# Altium PCB board.PcbDoc (part 3 of 3)
Units mm, origin at the board's own origin, x right, y up, seen from the top; angles counter-clockwise.
Board outline 86 x 120 mm, 4 copper layers (Top Layer, Signal Layer 1, Signal Layer 2, Bottom Layer), stack 1.571 mm thick; 144 components, 93 nets, 930 pads, 372 vias.
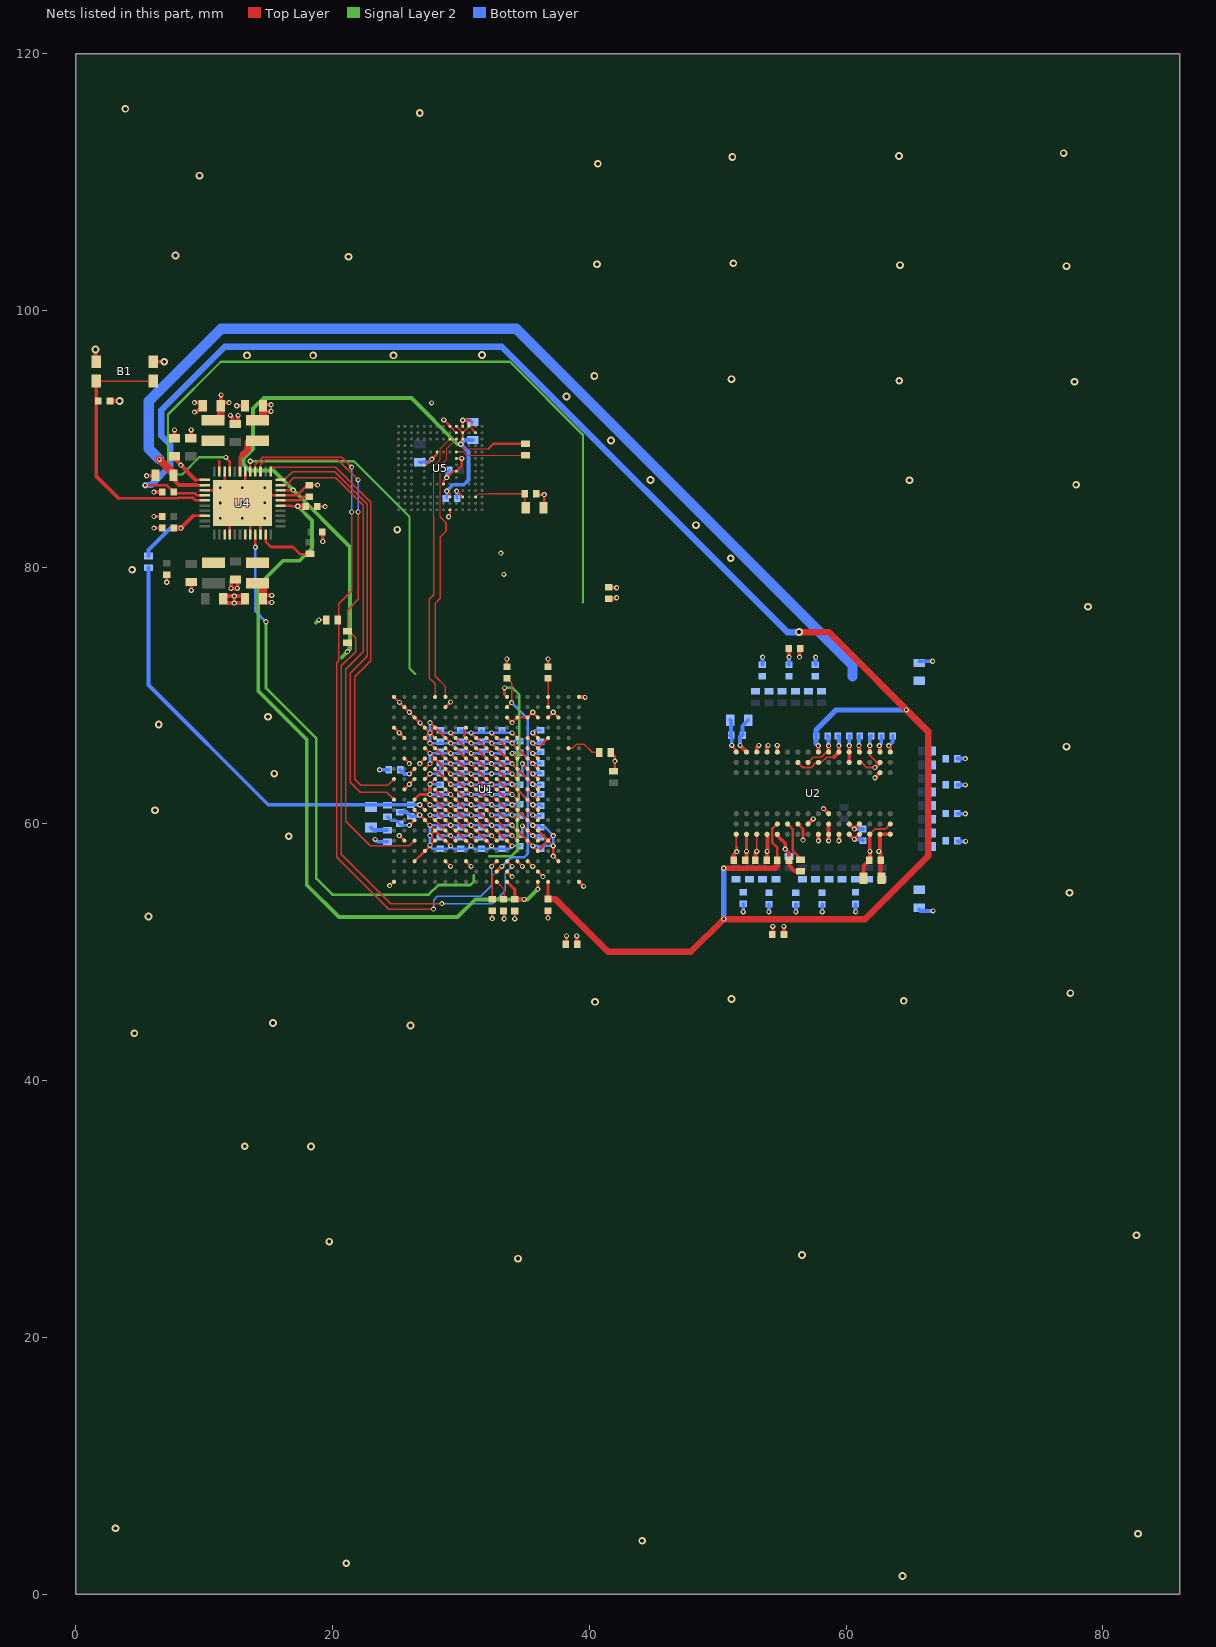
[diagram p5: the nets of this part, all layers, seen from the top]

## Via types
v1: diameter 0.4, hole 0.2, Top Layer to Bottom Layer, tented both sides, 309 vias
v2: diameter 0.6, hole 0.3, Top Layer to Bottom Layer, tented both sides, 61 vias
v3: diameter 0.4, hole 0.2, Top Layer to Signal Layer 1, tented top, 2 vias

## Nets (pads, with @x,y where several pads share a name; then routed paths per layer and width w, separated by ;. In a path a pad name is that pad's centre, name@x,y a point inside that pad or via, vN(x,y) a via of type N, cw(c..) or ccw(c..) an arc to the next point about the centre after c; other vN are vias at no path point) (continued)
GND: B1.1 B1.2 C1.1 C2.1 C3.1 C4.1 C5.1 C6.1 C7.1 C8.1 C9.1 C10.1 C11.1 C12.1 C13.1 C14.1 C15.1 C16.1 C17.1 C18.1 C19.1 C20.1 C21.1 C22.2 C23.1 C24.1 C25.1 C26.1 C27.1 C28.1 C29.1 C30.1 C31.1 C32.1 C33.1 C34.1 C35.1 C36.1 C37.1 C38.1 C39.1 C40.1 C41.1 C42.1 C43.1 C44.1 C45.1 C46.1 C47.1 C48.1 C49.1 C50.1 C51.2 C52.1 C53.1 C54.1 C55.1 C56.1 C57.1 C58.1 C59.1 C60.1 C61.1 C62.1 C63.1 C64.1 C65.1 C66.1 C67.1 C68.1 C69.1 C70.1 C71.1 C72.1 C73.1 C74.1 C75.1 C76.1 C77.1 C78.1 C79.1 C80.1 C81.1 C82.1 C83.1 C84.1 C85.1 C86.1 C87.1 C88.1 C89.1 C90.1 C91.1 C92.1 C93.1 C94.1 C95.1 C96.1 C97.1 R26.1 R27.2 R29.1 R30.1 U1.A1 U1.A19 U1.B2 U1.B6 U1.C3 U1.C12 U1.C13 U1.C14 U1.C15 U1.C16 U1.C17 U1.D1 U1.D4 U1.D5 U1.D8 U1.E2 U1.E4 U1.E5 U1.E6 U1.E8 U1.E10 U1.E12 U1.E14 U1.E16 U1.F5 U1.F7 U1.F9 U1.F11 U1.F13 U1.F15 U1.G2 U1.G4 U1.G6 U1.G8 U1.G10 U1.G12 U1.G14 U1.H5 U1.H7 U1.H9 U1.H11 U1.H13 U1.H15 U1.J3 U1.J4 U1.J6 U1.J8 U1.J10 U1.J12 U1.J14 U1.K2 U1.K5 U1.K7 U1.K9 U1.K11 U1.K13 U1.K15 U1.L4 U1.L6 U1.L8 U1.L10 U1.L12 U1.L14 U1.M3 U1.M5 U1.M7 U1.M9 U1.M11 U1.M13 U1.M15 U1.N4 U1.N6 U1.N8 U1.N10 U1.N12 U1.N14 U1.P5 U1.P7 U1.P9 U1.P11 U1.P13 U1.P15 U1.R2 U1.R5 U1.R6 U1.R8 U1.R10 U1.R12 U1.R14 U1.R16 U1.T4 U1.T15 U1.U3 U1.U6 U1.U8 U1.U13 U1.U14 U1.U17 U1.V12 U1.V15 U1.W1 U1.W19 U2.A9 U2.B1 U2.B3 U2.B9 U2.D1 U2.D8 U2.E1 U2.E2 U2.E8 U2.F9 U2.G1 U2.G8 U2.G9 U2.J2 U2.J8 U2.M1 U2.M9 U2.P1 U2.P9 U2.T1 U2.T9 U4.6 U4.10 U4.15 U4.26 U4.30 U4.32 U4.41 U4.ep U5.A6 U5.C4 U5.E7 U5.G5 U5.H10 U5.J5 U5.K8 U5.N2 U5.N5 U5.P4 U5.P6 | length 253.9
  Top Layer w0.09: 30.675,91.45 30.9,91.225 30.9,90.725
  Top Layer w0.12: U1.U17@37.55,57.1 U1.U17@37.6,57.1 ; U2.M1@54.65,65.6 U2.M1@54.65,65.7 ; C25.1@55.54,57.19 C25.1@55.56,57.17 ; v1@58.65,58.61 v1(58.65,58.7) ; U2.E8@60.25,60 U2.E8@60.27,60
  Top Layer w0.15: 51.45,58.25 U2.T9@51.45,59.2 ; v1(53.05,57.87) U2.P9@53.05,59.2 ; U2.J2@57.05,64.8 57.45,65.2 58.07,65.2 58.47,65.6 U2.G1@58.65,65.6
  Top Layer w0.175: B1.1@1.55,96.05 B1.1@1.6,96 B1.1@1.6,96.25 ; C46.1@6.2,87.125 C46.1@6.225,87.15 ; C18.1@8.975,90.05 C18.1@9,90.075 ; C29.1@9.65,92.825 C29.1@9.9,92.575 ; C40.1@11.7,77.75 C40.1@11.5,77.55 11.85,77.2 ; C33.1@12.425,91.15 C33.1@12.65,91.375 ; 12.85,77.2 C38.1@13.2,77.55 C38.1@13,77.75 ; U4.ep@13,85 13.2,85.2 13.6,85.6 U4.41@15.95,85.6 ; C52.1@18.85,84.725 v1(19.425,84.725) ; C51.2@19.2,82.75 C51.2@19.25,82.7 ; U5.H10@27.15,87.975 27.3,87.975 v1(27.75,88.425) 28.15,88.825 U5.K8@28.15,88.975 ; U5.E7@28.65,86.475 28.65,86.725 v1(28.9,86.975) 29.4,87.475 U5.G5@29.65,87.475 30.075,87.9 v1(30.075,88.475) U5.J5@29.65,88.475 ; v1(28.675,91.475) 29.15,91 U5.P6@29.15,90.975 U5.N5@29.65,90.475 ; v1(29.05,83.925) 29.15,84.025 U5.A6@29.15,84.475 ; v1(29.675,85.925) 29.7,85.925 U5.C4@30.15,85.475 ; U5.P4@30.15,90.948 U5.P4@30.15,90.975 v1(30.15,91.45) 30.675,91.45 ; 30.9,90.725 U5.N2@31.15,90.475 ; v1@33.125,81 v1(33.125,81.1) ; C82.1@35.875,85.725 35.95,85.65 v1(36.5,85.65) 36.5,84.675 C83.1@36.45,84.625
  Top Layer w0.2: U4.15@10.05,86 U4.ep@12,86 ; U4.10@11.6,87.45 11.6,86.4 U4.ep@12,86 ; U4.26@12,82.55 12,84 U4.ep@13,85 ; U4.ep@13.2,85.2 U4.6@13.2,87.45 ; U4.30@13.6,82.55 U4.ep@13.6,84.4 ; U4.32@14.4,82.55 14.4,83.6 U4.ep@13.6,84.4 ; U4.41@15.95,85.6 17.25,85.6 18.05,86.4 C43.1@18.2,86.4 ; v1(24.45,55.2) 24.75,55.5 U1.W1@24.8,55.5 ; U1.D1@24.8,67.5 U1.E2@25.6,66.7 ; U1.A1@24.8,69.9 v1(25.225,69.475) v1(26,68.7) v1(27.6,67.1) ; v1(25.2,59.1) U1.R2@25.6,58.7 ; U1.K2@25.6,62.7 v1(26,63.1) U1.J3@26.4,63.5 ; U1.G2@25.6,65.1 v1(26,64.7) ; U1.U3@26.4,57.1 U1.T4@27.2,57.9 U1.R5@28,58.7 v1(27.6,59.1) U1.P5@27.995,59.495 ; U1.M3@26.4,61.1 v1(26.8,60.7) U1.N4@27.2,60.3 27.2,60.29 v1(27.6,59.89) U1.P5@27.995,59.495 ; v1(26.8,64.7) U1.G4@27.2,65.1 ; U1.L4@27.2,61.9 v1(27.6,61.5) v1(29.2,59.9) U1.R8@30.4,58.7 v1(30.8,58.3) ; U1.J4@27.2,63.5 27.2,63.51 v1(27.6,63.91) ; v1(27.6,67.9) U1.D5@28,67.5 ; U1.P5@28,59.5 U1.P5@27.995,59.495 ; U1.K5@28,62.7 v1(29.2,61.5) U1.M7@29.6,61.1 U1.P9@31.2,59.5 U1.R10@32,58.7 v1(32.4,58.3) ; U1.H5@28,64.3 U1.J6@28.8,63.5 v1(29.2,63.1) v1(30.8,61.5) U1.M9@31.2,61.1 U1.N10@32,60.3 v1(32.4,59.9) v1(34,58.3) ; U1.E5@28,66.7 v1(27.6,67.1) ; U1.U6@28.8,57.1 v1(29.2,56.7) ; U1.B6@28.8,69.1 v1(29.2,69.5) ; v1(29.2,58.3) U1.R6@28.8,58.7 28.79,58.7 U1.P5@27.995,59.495 ; U1.U8@30.4,57.1 v1(30.8,56.7) ; U1.D8@30.4,67.5 30.27,67.37 30.27,66.83 U1.E8@30.4,66.7 v1(30.8,66.3) U1.G10@32,65.1 v1(32.4,64.7) v1(34,63.1) v1(35.6,61.5) U1.M15@36,61.1 ; U1.E10@32,66.7 v1(32.4,66.3) v1(34,64.7) U1.H13@34.4,64.3 v1(35.6,63.1) U1.K15@36,62.7 ; v1(32.45,52.63) C67.1@32.45,53.24 ; v1(33.37,52.62) C69.1@33.37,53.24 ; C66.1@33.59,72.37 v1@33.59,72.84 ; U1.V12@33.6,56.3 v1(34,55.9) ; U1.E12@33.6,66.7 v1(34,66.3) U1.G14@35.2,65.1 v1(35.6,64.7) U1.H15@36,64.3 ; U1.C12@33.6,68.3 v1(34,67.9) U1.C13@34.4,68.3 U1.C14@35.2,68.3 v1(35.6,68.7) U1.C15@36,68.3 ; v1(34.2,52.605) C71.1@34.2,53.225 ; U1.U13@34.4,57.1 v1(34.8,56.7) ; U1.U14@35.2,57.1 v1(35.6,56.7) ; U1.E14@35.2,66.7 v1(35.6,66.3) U1.F15@36,65.9 U1.E16@36.8,66.7 ; U1.V15@36,56.3 v1(36.4,55.9) ; v1(36.79,52.68) C72.1@36.79,53.26 ; U1.C16@36.8,68.3 v1(37.2,68.7) U1.C17@37.6,68.3 ; C68.1@36.8,72.25 v1(36.8,72.85) ; v1(37.2,59.1) U1.R16@36.8,58.7 ; U1.U17@37.6,57.1 v1(37.2,57.5) v1(37.2,58.3) U1.R16@36.8,58.7 ; C28.1@38.18,50.63 38.23,50.68 v1(38.23,51.28) ; R27.2@41.73,65.64 R27.2@41.67,65.58 42,65.25 v1(42,64.9) 42,64.225 R29.1@41.875,64.1 ; v1(51.1,66.12) 51.45,65.77 U2.T1@51.45,65.6 ; 51.45,58.25 51.49,58.21 v1(51.49,57.85) ; U4.ep@12,86 U4.ep@13,85 ; U4.ep@13,85 U4.ep@13.6,84.4 ; v1(27.6,67.1) U1.E4@27.2,66.7 v1(27.6,66.3) U1.F5@28,65.9 v1(29.2,64.7) U1.H7@29.6,64.3 U1.J8@30.4,63.5 v1(30.8,63.1) U1.L10@32,61.9 v1(32.4,61.5) U1.M11@32.8,61.1 v1(34,59.9) U1.R14@35.2,58.7 v1(35.6,58.3) U1.T15@36,57.9 U1.R16@36.8,58.7 ; v1(27.6,67.1) U1.D5@28,67.5 ; U1.D5@28,67.5 U1.E6@28.8,66.7 v1(29.2,66.3) U1.G8@30.4,65.1 v1(30.8,64.7) v1(32.4,63.1) U1.K11@32.8,62.7 v1(34,61.5) U1.N14@35.2,60.3 U1.P15@36,59.5 U1.R16@36.8,58.7
  Top Layer w0.25: v3(6.1,83.05) C49.1@6.75,83.05 ; v3(6.1,83.95) C41.1@6.75,83.95 ; v1(7.1,78.825) C32.1@7.1,79.4 ; v1(9,78.2) C39.1@9,78.85 ; C43.1@18.2,86.4 v1(18.85,86.4)
  Top Layer w0.3: B1.1@1.55,96.05 v2(1.55,96.95) ; C44.1@2.675,92.95 v2(3.425,92.95) ; v1(5.525,87.125) C46.1@6.2,87.125 ; B1.2@6.05,96 v2(6.9,96) ; v1(6.1,85.85) C45.1@6.75,85.85 ; C42.1@7.7,90.05 v1(7.7,90.7) ; C18.1@9,90.075 v1(9,90.7) ; v1(9.25,92.075) 9.4,92.075 C29.1@9.9,92.575 ; v1(9.25,92.825) C29.1@9.65,92.825 ; C40.1@11.7,77.75 v1(12.35,77.75) ; 11.85,77.2 v1(12.35,77.2) ; v1(12.05,91.825) 12.225,91.65 C33.1@12.225,91.375 ; C31.1@12.1,79 v1(12.1,78.35) v1(12.6,78.35) 12.6,78.9 C31.1@12.45,79.05 ; v1(12.55,92.575) C34.1@13.2,92.575 ; C33.1@12.65,91.375 v1(12.65,91.825) ; 12.85,77.2 v1(12.35,77.2) ; C38.1@13,77.75 v1(12.35,77.75) ; v1(19.25,82) C51.2@19.25,82.7 ; U1.W19@39.2,55.5 v1(39.56,55.14) ; U1.A19@39.2,69.9 39.64,69.9 v1(39.68,69.86) ; C26.1@41.52,78.45 41.57,78.4 v1(42.13,78.4) ; C73.1@51.25,57.17 51.25,57.61 v1(51.49,57.85) ; C19.1@52.94,57.17 52.94,57.76 v1(53.05,57.87) ; U2.P1@53.05,65.6 53.05,65.96 v1(53.21,66.12) ; U2.M9@54.65,59.2 54.65,59.1 55.27,58.48 v1(55.27,58.05) 55.27,58 55.54,57.73 C25.1@55.54,57.19 ; U2.M1@54.65,65.6 v1(54.65,66.12) ; v1(55.16,52.02) 55.16,51.41 C74.1@55.17,51.4 ; C27.1@55.53,73.68 55.57,73.64 v1(55.57,73) ; C25.1@55.56,57.17 55.59,57.14 55.59,56.72 55.98,56.33 R26.1@56.46,56.33 ; U2.J8@57.05,60 v1(57.45,60.4) ; v1(58.65,58.7) U2.G8@58.65,60 ; U2.G1@58.65,65.6 v1(58.65,66.1) ; v1(59.45,58.7) U2.F9@59.45,59.2 ; U2.E8@60.25,60 v1(60.65,59.6) U2.D8@61.05,60 ; U2.E2@60.25,64.8 v1(60.25,66.1) ; v1(61.01,66.1) 61.01,65.64 U2.D1@61.05,65.6 ; v1(62.25,63.6) U2.B3@62.65,64 ; v1(62.59,66.1) 62.65,66.04 U2.B1@62.65,65.6 ; C15.1@62.7,55.89 C17.1@62.7,57.17 62.7,57.72 v1(62.55,57.87) 62.65,57.97 U2.B9@62.65,59.2 U2.A9@63.45,59.2 ; v1(12.35,77.2) v1(12.35,77.75)
  Bottom Layer w0.12: v1@58.62,66.13 v1(58.65,66.1)
  Bottom Layer w0.175: v1(29.675,85.925) 29.675,85.4 C80.1@29.725,85.35 ; C81.1@30.775,91.45 C81.1@30.925,91.3
  Bottom Layer w0.2: v1(27.6,61.5) 27.68,61.42 C65.1@28.4,61.42 28.48,61.5 v1(29.2,61.5) 29.28,61.42 C88.1@30,61.42 30.08,61.5 v1(30.8,61.5) 30.88,61.42 C89.1@31.6,61.42 31.68,61.5 v1(32.4,61.5) 32.48,61.42 C90.1@33.2,61.42 33.28,61.5 v1(34,61.5) 34.06,61.56 C91.1@34.6,61.56 ; v1(27.6,63.91) 28.34,63.91 C48.1@28.4,63.97 C84.1@28.4,64.72 28.42,64.7 v1(29.2,64.7) 29.22,64.72 C35.1@30,64.72 30.02,64.7 v1(30.8,64.7) 30.82,64.72 C36.1@31.6,64.72 31.62,64.7 v1(32.4,64.7) 32.42,64.72 C37.1@33.2,64.72 33.22,64.7 v1(34,64.7) ; v1(27.6,67.9) v1(27.6,67.1) v1(27.6,66.3) 28.31,66.3 C30.1@28.4,66.39 28.49,66.3 v1(29.2,66.3) 29.91,66.3 C75.1@30,66.39 30.71,66.39 v1(30.8,66.3) 31.51,66.3 C76.1@31.6,66.39 32.31,66.39 v1(32.4,66.3) 33.11,66.3 C77.1@33.2,66.39 33.91,66.39 v1(34,66.3) 34.2,66.5 C47.1@34.8,66.5 ; v1(29.2,63.1) 29.23,63.07 C85.1@30,63.07 30.03,63.1 v1(30.8,63.1) 30.83,63.07 C86.1@31.6,63.07 31.63,63.1 v1(32.4,63.1) 32.43,63.07 C87.1@33.2,63.07 33.23,63.1 v1(34,63.1) ; v1(34,59.9) 33.34,59.9 C13.1@33.2,59.76 33.06,59.9 v1(32.4,59.9) 31.74,59.9 C94.1@31.6,59.76 31.46,59.9 v1(30.8,59.9) 30.14,59.9 C93.1@30,59.76 29.86,59.9 v1(29.2,59.9) 28.54,59.9 C92.1@28.4,59.76 28.27,59.89 v1(27.6,59.89) v1(27.6,59.1) v1(27.6,58.33) 27.6,58.25 27.78,58.07 C95.1@28.4,58.07 28.97,58.07 v1(29.2,58.3) 29.43,58.07 C96.1@30,58.07 30.57,58.07 v1(30.8,58.3) 31.03,58.07 C97.1@31.6,58.07 32.17,58.07 v1(32.4,58.3) 32.63,58.07 C14.1@33.2,58.07 33.77,58.07 v1(34,58.3) C59.1@34.6,58.3 ; v1@34.03,63.07 v1(34,63.1) ; C55.1@34.6,63.1 v1(34,63.1) ; v1(35.6,58.3) 35.99,58.3 C60.1@36.22,58.07 36.245,58.045 36.5,58.3 v1(37.2,58.3) v1(37.2,59.1) 36.54,59.76 36.27,59.76 36.13,59.9 v1(35.6,59.9) ; v1(35.6,61.5) 36.2,61.5 C57.1@36.3,61.4 ; v1(35.6,63.1) 35.63,63.07 C56.1@36.22,63.07 ; v1(35.6,64.7) 35.62,64.72 C54.1@36.22,64.72 ; v1(35.6,66.3) 36.13,66.3 C53.1@36.22,66.39 ; C12.1@51.99,53.8 C12.1@52,53.79 ; C11.1@54,53.75 C11.1@54.01,53.76 ; v1(55.27,58.05) 55.57,57.75 R30.1@55.57,57.47 ; C10.1@56.09,53.76 C10.1@56.1,53.75 ; C9.1@58.14,53.76 C9.1@58.15,53.75 ; C8.1@60.73,53.77 C8.1@60.75,53.75 ; C7.1@68.66,58.69 C7.1@68.7,58.65 ; C6.1@68.66,60.81 C6.1@68.67,60.8 ; C5.1@68.66,63.06 C5.1@68.67,63.05 ; C4.1@68.66,65.08 C4.1@68.67,65.09
  Bottom Layer w0.3: v1(23.675,64.225) C61.1@24.375,64.225 ; C50.1@25.25,60.925 25.775,60.925 C70.1@26.1,60.6 26.7,60.6 v1(26.8,60.7) ; C79.1@26.8,88.175 27.5,88.175 v1(27.75,88.425) ; v1(28.9,86.975) 28.9,87.35 C78.1@29.1,87.55 ; v1(30.15,91.45) C81.1@30.775,91.45 ; C64.1@50.95,66.91 51.1,66.76 v1(51.1,66.12) ; C16.1@50.99,68.09 51.05,68.03 C64.1@51.05,66.91 ; v1(52,53.15) C12.1@52,53.79 ; C1.1@53.48,72.4 53.5,72.42 v1(53.5,73) ; v1(54,53.15) C11.1@54,53.75 ; C2.1@55.55,72.4 55.57,72.42 v1(55.57,73) ; v1(56.1,53.15) C10.1@56.1,53.75 ; C3.1@57.61,72.4 57.63,72.42 v1(57.63,73) ; v1(58.15,53.15) C9.1@58.15,53.75 ; C24.1@58.57,66.86 58.65,66.78 v1(58.65,66.1) ; v1(60.25,66.1) 60.25,66.84 C23.1@60.27,66.86 ; v1(60.65,59.6) 60.66,59.61 C22.2@61.33,59.61 ; v1(60.75,53.15) C8.1@60.75,53.75 ; v1(61.01,66.1) 61.01,66.81 C21.1@61.06,66.86 ; v1(62.59,66.1) 62.74,66.25 C20.1@62.74,66.86 ; C63.1@65.69,53.33 65.79,53.23 v1(66.78,53.23) ; C62.1@65.71,72.7 65.73,72.68 v1(66.75,72.68) ; C6.1@68.67,60.8 v1(69.3,60.8) ; C5.1@68.67,63.05 v1(69.3,63.05) ; C4.1@68.67,65.09 v1(69.3,65.09) ; C7.1@68.7,58.65 v1(69.31,58.65)
  other v1: 25.2,67.1 26.825,67.875 33.59,72.85 33.35,79.44 11.275,83.8 12.975,83.8 14.725,83.8 11.25,85 12.975,85.025 14.725,85.025 11.275,86.2 12.975,86.2 14.725,86.2 27.725,92.8
  other v2: 64.4,1.425 21.075,2.425 44.125,4.175 82.75,4.725 3.1,5.15 34.45,26.15 56.575,26.425 19.75,27.475 82.625,27.975 18.325,34.875 13.175,34.9 4.575,43.7 26.075,44.3 15.375,44.5 40.45,46.15 64.5,46.225 51.075,46.375 77.475,46.825 5.675,52.8 77.4,54.65 16.6,59.05 6.175,61.075 15.475,63.925 77.175,66.025 6.475,67.75 14.975,68.35 78.85,76.925 4.4,79.8 51.025,80.7 25.05,82.925 48.325,83.275 77.925,86.425 64.95,86.775 44.775,86.8 41.7,89.875 38.225,93.3 77.8,94.45 64.15,94.525 51.075,94.65 40.4,94.9 13.35,96.5 18.5,96.5 24.75,96.5 31.65,96.525 77.175,103.45 64.2,103.525 40.6,103.6 51.225,103.675 21.25,104.175 7.775,104.275 9.65,110.5 40.675,111.425 51.15,111.95 64.125,112.025 76.95,112.25 26.8,115.375 3.875,115.7
I2C4_SCL: R37.2 U1.U11 U4.4 | length 56.5
  Top Layer w0.09: 13.975,87.99 13.975,87.475 U4.4@14,87.45
  Top Layer w0.1: 13.975,87.99 14.56,88.575 20.725,88.575 v1(21.5,87.8) v1@21.425,87.8 ; v1(21.5,84.3) 21.5,78.15 20.5,77.15 20.5,72.725 20.325,72.55 20.325,57.425 24.375,53.375 v1(27.875,53.375)
  Top Layer w0.2: v1(32.4,56.7) U1.U11@32.8,57.1
  Bottom Layer w0.1: v1(21.5,84.3) v1(21.5,87.8) ; v1(27.875,53.375) 27.875,54.075 28.175,54.375 31.55,54.375 32.4,55.225 v1(32.4,56.7)
I2C4_SDA: R38.2 U1.U12 U4.3 | length 56.7
  Top Layer w0.09: U4.3@14.4,87.45 14.4,88.025
  Top Layer w0.1: 14.4,88.025 14.75,88.375 20.425,88.375 v1(22,86.8) ; v1@22.025,84.275 22.025,77.5 21.175,76.65 R38.2@21.175,75 21.325,75 21.8,74.525 21.8,73.425 20.7,72.325 20.7,57.65 24.55,53.8 v1(28.525,53.8)
  Top Layer w0.2: U1.U12@33.6,57.1 v1(34,56.7)
  Bottom Layer w0.1: v1(22,84.3) v1(22,86.8) ; v1(28.525,53.8) 32.45,53.8 33.45,54.8 33.45,56.15 v1(34,56.7)
NetB1_3: B1.3 B1.4 C44.2 U4.17 | length 21.5
  Top Layer w0.1: B1.3@1.325,94.775 B1.3@1.6,94.5 B1.4@6.05,94.5
  Top Layer w0.2: 3.33,85.37 6.412,85.37 7.988,85.37 8.018,85.4 9.15,85.4 9.35,85.2 U4.17@10.05,85.2
  Top Layer w0.3: B1.3@1.6,94.45 1.6,92.95 1.6,87.1 3.33,85.37
NetC43_2: C43.2 U4.40 | length 2.4
  Top Layer w0.2: U4.40@15.95,85.2 17.45,85.2 17.75,85.5 C43.2@18.2,85.5
NetC61_2: C61.2 U1.H3 | length 1.4
  Top Layer w0.2: v1(26,63.9) U1.H3@26.4,64.3
  Bottom Layer w0.3: C61.2@25.275,64.225 25.6,63.9 v1(26,63.9)
NetC68_2: C68.2 U1.A16 U1.B16 | length 2.3
  Top Layer w0.12: U1.B16@36.8,69.1 U1.A16@36.8,69.9 C68.2@36.8,71.35
NetC69_2: C69.2 U1.W11 | length 1.6
  Top Layer w0.12: U1.W11@32.8,55.5 33.37,54.93 C69.2@33.37,54.14
NetC70_2: C70.2 L5.2 R41.1 R42.2 U1.M4 | length 34.7
  Top Layer w0.2: v1(26.8,61.5) U1.M4@27.2,61.1
  Bottom Layer w0.3: R42.2@5.675,79.975 5.675,70.825 15,61.5 C70.2@26.1,61.5 v1(26.8,61.5)
NetC82_2: C82.2 C83.2 U5.C2 | length 5.1
  Top Layer w0.09: U5.C2@31.15,85.475 31.4,85.725 32.15,85.725
  Top Layer w0.1: 32.15,85.725 C82.2@34.975,85.725 34.975,84.7 C83.2@35.05,84.625
NetL1_1: L1.1 U4.7 | length 3.2
  Top Layer w0.2: U4.7@12.8,87.45 12.8,88.55 13,88.75
  Top Layer w0.5: 13,88.75 13.4,89.15 13.4,89.75 13.5,89.85 L1.1@14,89.85
NetL2_1: L2.1 U4.11 | length 0.8
  Top Layer w0.2: U4.11@11.2,87.45 11.2,88.25
NetL3_1: L3.1 U4.29
NetL4_1: L4.1 U4.25
NetL5_1: L5.1 R39.2 | length 1.4
  Bottom Layer w0.3: L5.1@23,59.725 23.2,59.525 R39.2@24.275,59.525
NetR26_2: R26.2 U2.L8 | length 3.2
  Top Layer w0.2: U2.L8@55.45,60 55.85,59.6 55.85,57.92 56.46,57.31 R26.2@56.46,57.23
NetR27_1: R27.1 U1.F18 | length 2.8
  Top Layer w0.12: U1.F18@38.4,65.9 38.68,65.9 39,66.22 39.6,66.22 40.24,65.58 R27.1@40.77,65.58
NetR40_1: R40.1 U5.K5 | length 5.5
  Top Layer w0.09: 30.175,88.975 30.425,88.725 R40.1@35.025,88.725
  Top Layer w0.1: U5.K5@29.65,88.975 30.175,88.975
NetR43_1: R43.1 U4.33 | length 4.4
  Top Layer w0.2: U4.33@14.8,82.55 14.8,82 15.225,81.575 16.925,81.575 17.5,81 R43.1@18.25,81
NRST: U1.J1 U4.1 | length 34.8
  Top Layer w0.09: U4.1@15.2,87.45 U4.1@15.2,87.8
  Top Layer w0.1: U4.1@15.2,87.8 20.275,87.8 23,85.075 23,72.7 21.75,71.45 21.75,63.5 22.225,63.025 24.325,63.025 U1.J1@24.8,63.5
PA0_WKUP: U1.R3 U4.43 | length 39
  Top Layer w0.1: 16.45,86.4 17,86.95 20.275,86.95 22.4,84.825 22.4,73.4 21.05,72.05 21.05,60.2 22.95,58.3 26,58.3 U1.R3@26.4,58.7
  Top Layer w0.12: U4.43@15.95,86.4 16.45,86.4
PWR_ON: U1.L1 U4.44 | length 34.3
  Top Layer w0.1: U4.44@15.95,86.8 16.25,86.8 16.9,87.45 20.175,87.45 22.725,84.9 22.725,73.05 21.4,71.725 21.4,63.25 22.175,62.475 24.225,62.475 U1.L1@24.8,61.9
SDMMC2_CK: U1.A5 U5.M6 | length 20.9
  Top Layer w0.09: 27.9,83.975 27.9,87.875 28.4,88.375 28.4,89.225 U5.M6@29.15,89.975
  Top Layer w0.12: 27.9,80.825 27.9,77.85 27.55,77.5 27.55,71.375 28,70.925 U1.A5@28,69.9
  Top Layer w0.13: 27.9,80.825 27.9,83.975
SDMMC2_CMD: U1.A6 U5.M5 | length 21.5
  Top Layer w0.09: 28.4,83.925 28.4,87.9 28.9,88.4 28.9,89.225 U5.M5@29.65,89.975
  Top Layer w0.12: 28,77.175 28,71.5 28.8,70.7 U1.A6@28.8,69.9
  Top Layer w0.13: 28,77.175 28.4,77.575 28.4,82.35 28.85,82.8 28.85,83.475 28.4,83.925
VDD: C38.2 C47.2 C48.2 C65.2 C80.2 C81.2 C92.2 C93.2 C94.2 C95.2 C96.2 C97.2 L3.2 R37.1 R38.1 R39.1 R40.2 U1.A12 U1.G13 U1.J5 U1.K6 U1.L3 U1.L5 U1.L7 U1.M6 U1.M8 U1.N5 U1.N7 U1.N9 U1.P6 U1.P8 U1.P10 U1.R7 U1.R9 U1.R11 U4.31 U4.42 U5.C6 U5.M4 U5.N4 U5.P3 U5.P5 | length 152.7
  Top Layer w0.09: v1(30,89.575) 30.35,89.225 32.15,89.225
  Top Layer w0.1: v1(21.175,73.425) R38.1@21.175,74.1
  Top Layer w0.12: v1(18.95,75.9) R37.1@19.525,75.9
  Top Layer w0.175: v1(28.9,85.925) 29.15,85.675 U5.C6@29.15,85.475 ; U5.P5@29.65,90.975 U5.N4@30.15,90.475 ; v1(30,89.575) 30,89.825 U5.M4@30.15,89.975 U5.N4@30.15,90.475 ; U5.P3@30.65,90.975 U5.N4@30.15,90.475 ; 32.15,89.225 32.55,89.625 R40.2@35.025,89.625
  Top Layer w0.2: v1(14,81.55) U4.31@14,82.55 ; U4.42@15.95,86 v1(16.95,86) ; U1.L3@26.4,61.9 26.8,62.3 v1(27.6,62.3) ; v1(27.6,60.7) U1.P6@28.8,59.5 v1(29.2,59.1) U1.R7@29.6,58.7 ; U1.J5@28,63.5 v1(27.6,63.1) v1(27.6,62.3) ; U1.K6@28.8,62.7 U1.L7@29.6,61.9 U1.M8@30.4,61.1 v1(30.8,60.7) U1.N9@31.2,60.3 v1(32.4,59.1) U1.R11@32.8,58.7 ; U1.R9@31.2,58.7 v1(30.8,59.1) U1.P8@30.4,59.5 U1.N7@29.6,60.3 v1(29.2,60.7) U1.M6@28.8,61.1 v1(27.6,62.3) ; v1(33.4,70.6) 33.4,70.1 U1.A12@33.6,69.9 ; v1(34,65.5) U1.G13@34.4,65.1
  Top Layer w0.3: C38.2@14.65,77.475 14.875,77.25 v1(15.275,77.25) ; C38.2@14.85,77.8 v1(15.275,77.8)
  Top Layer w0.6: C38.2@14.6,77.55 L3.2@14.6,78.75
  Signal Layer 2 w0.2: v1(14.825,75.75) 14.825,70.575 18.75,66.65 18.75,55.75 20,54.5 27.5,54.5 28.25,55.25 30.75,55.25 31,55.5 31,56 ; 32.2,57.5 33.95,57.5 34.45,58 34.45,59.475 34.4,59.525 34.4,60.325 34.525,60.45 34.525,64.225 34.4,64.35 34.4,65.075 34.55,65.225 34.55,65.5 ; v1(33.4,70.6) 34.025,70.6 34.55,70.075 34.55,65.5 ; v1(34,65.5) 34.55,65.5
  Signal Layer 2 w0.3: 18.725,75.675 v1(18.95,75.9) ; 20.725,72.975 v1(21.175,73.425) 21.375,73.625 21.375,81.575 v1(16.95,86) 15.425,87.525 13.55,87.525 13.075,88 13.075,88.45 13.825,89.2 13.825,92.35 14.65,93.175 26.15,93.175 29.75,89.575 v1(30,89.575)
  Bottom Layer w0.1: C80.2@28.825,85.35 C80.2@28.9,85.425
  Bottom Layer w0.175: C80.2@28.9,85.425 v1(28.9,85.925)
  Bottom Layer w0.2: v1(14,81.55) 14,76.575 v1(14.825,75.75) ; v1@27.64,60.73 27.57,60.66 C92.2@28.4,60.66 29.16,60.66 v1(29.2,60.7) 29.24,60.66 C93.2@30,60.66 30.04,60.7 v1(30.8,60.7) 30.84,60.66 C94.2@31.6,60.66 ; C95.2@28.4,58.97 28.53,59.1 v1(29.2,59.1) 29.33,58.97 C96.2@30,58.97 30.13,59.1 v1(30.8,59.1) 30.93,58.97 C97.2@31.6,58.97 31.73,59.1 v1(32.4,59.1) ; C48.2@28.4,63.07 28.37,63.1 v1(27.6,63.1) v1(27.6,62.3) 28.38,62.3 C65.2@28.4,62.32 28.42,62.3 v1(29.2,62.3) ; v1(34,65.5) 34.1,65.6 C47.2@34.8,65.6
  Bottom Layer w0.25: v1(23.325,58.8) 23.5,58.625 R39.1@24.275,58.625
  Bottom Layer w0.3: v1(28.9,85.925) 29.4,86.425 30.225,86.425 30.6,86.8 30.6,88.975 v1(30,89.575) 30.325,89.9 C81.2@30.925,89.9
VDD_CORE: C13.2 C14.2 C30.2 C34.2 C35.2 C36.2 C37.2 C75.2 C76.2 C77.2 C84.2 C85.2 C86.2 C87.2 C88.2 C89.2 C90.2 C91.2 L1.2 U1.E7 U1.E9 U1.E11 U1.E13 U1.F4 U1.F6 U1.F8 U1.F10 U1.F12 U1.G5 U1.G7 U1.G9 U1.G11 U1.H4 U1.H6 U1.H8 U1.H10 U1.H12 U1.J7 U1.J9 U1.J11 U1.J13 U1.K8 U1.K10 U1.K12 U1.L9 U1.L11 U1.L13 U1.M10 U1.M12 U1.N11 U1.N13 U1.P12 U1.R13 U4.5 | length 88.2
  Top Layer w0.15: U4.5@13.6,87.45 v1(13.6,88.25)
  Top Layer w0.175: C34.2@14.6,92.575 C34.2@14.675,92.65
  Top Layer w0.2: U1.H4@27.2,64.3 v1(27.6,64.7) U1.G5@28,65.1 ; U1.F4@27.2,65.9 v1(27.6,65.5) U1.G5@28,65.1 ; U1.F6@28.8,65.9 v1(29.2,65.5) U1.G7@29.6,65.1 v1(30.8,63.9) v1(32.4,62.3) U1.L11@32.8,61.9 v1(34,60.7) U1.N13@34.4,60.3 ; v1(29.2,67.1) U1.F8@30.4,65.9 v1(30.8,65.5) U1.G9@31.2,65.1 U1.H10@32,64.3 U1.H10@32,64.25 ; v1(30.8,67.1) U1.E9@31.2,66.7 U1.F10@32,65.9 v1(32.4,65.5) U1.H12@33.6,64.3 v1(34,63.9) U1.J13@34.4,63.5 ; v1(32.4,67.1) U1.E11@32.8,66.7 U1.F12@33.6,65.9 ; U1.J11@32.8,63.5 U1.K12@33.6,62.7 v1(34,62.3) U1.L13@34.4,61.9 ; v1(34,67.1) U1.E13@34.4,66.7 ; U1.R13@34.4,58.7 v1(34,59.1) U1.P12@33.6,59.5 U1.N11@32.8,60.3 v1(32.4,60.7) U1.M10@32,61.1 U1.L9@31.2,61.9 U1.K8@30.4,62.7 U1.H6@28.8,64.3 U1.G5@28,65.1
  Top Layer w0.3: 14.6,92.1 v1@15.175,92.1 ; C34.2@14.675,92.65 v1(15.225,92.65)
  Top Layer w0.6: L1.2@14,91.45 L1.2@14.15,91.45 14.4,91.45 14.6,91.65 14.6,92.1 C34.2@14.6,92.55
  Signal Layer 2 w0.175: v1(13.6,88.25) 21.675,88.25 26,83.925 26,72.125 26.45,71.675
  Bottom Layer w0.175: v1@15.175,92.1 v1(15.225,92.15)
  Bottom Layer w0.2: v1(27.6,64.7) v1(27.6,65.5) 28.28,65.5 C84.2@28.4,65.62 28.52,65.5 v1(29.2,65.5) 29.88,65.5 C35.2@30,65.62 30.68,65.62 v1(30.8,65.5) 31.48,65.5 C36.2@31.6,65.62 32.28,65.62 v1(32.4,65.5) 33.08,65.5 C37.2@33.2,65.62 ; C30.2@28.4,67.29 28.59,67.1 v1(29.2,67.1) 29.81,67.1 C75.2@30,67.29 30.19,67.1 v1(30.8,67.1) 31.41,67.1 C76.2@31.6,67.29 31.79,67.1 v1(32.4,67.1) 33.01,67.1 C77.2@33.2,67.29 33.39,67.1 v1(34,67.1) ; v1(29.2,63.9) 29.93,63.9 C85.2@30,63.97 30.07,63.9 v1(30.8,63.9) 31.53,63.9 C86.2@31.6,63.97 31.66,63.91 v1(32.4,63.91) C87.2@33.14,63.91 ; C88.2@30,62.32 30.78,62.32 v1(30.8,62.3) 31.58,62.3 C89.2@31.6,62.32 32.38,62.32 v1(32.4,62.3) 33.18,62.3 C90.2@33.2,62.32 33.98,62.32 v1(34,62.3) ; v1(32.4,60.7) 33.16,60.7 C13.2@33.2,60.66 33.24,60.7 v1(34,60.7) C91.2@34.6,60.7 ; C14.2@33.2,58.97 33.33,59.1 v1(34,59.1) ; C87.2@33.2,63.97 C87.2@33.14,63.91 ; v1(34,63.9) 33.15,63.9 C87.2@33.14,63.91
VDD_DDR: C15.2 C16.2 C17.2 C19.2 C20.2 C21.2 C22.1 C23.2 C26.2 C27.2 C28.2 C29.2 C42.2 C53.2 C54.2 C55.2 C56.2 C57.2 C58.2 C59.2 C60.2 C64.2 C73.2 C74.2 L2.2 U1.E15 U1.F14 U1.G15 U1.H14 U1.J15 U1.K14 U1.L15 U1.M14 U1.N15 U1.P14 U1.R15 U2.A1 U2.A8 U2.B2 U2.C1 U2.C9 U2.D2 U2.D9 U2.E9 U2.F1 U2.G7 U2.H2 U2.H9 U2.K2 U2.K8 U2.N1 U2.N9 U2.R1 U2.R9 U4.9 U4.13 | length 111.2
  Top Layer w0.15: U2.K2@56.25,64.79 56.643,64.397 57.289,64.397 57.692,64.8 58.09,64.8 58.49,65.2 59.055,65.2 ; U2.D2@61.05,64.8 61.23,64.8 61.63,64.4 v1(62.25,64.4) ; U2.C9@61.85,59.2 62.25,59.6 63.05,59.6 U2.A8@63.45,60 ; U2.C1@61.85,65.6 61.85,65.35 62.4,64.8 U2.B2@62.65,64.8
  Top Layer w0.153: v1(62.25,64.4) U2.B2@62.525,64.675
  Top Layer w0.175: C42.2@7.7,88.45 C42.2@7.7,88.65 ; C29.2@11.3,92.575 11.325,92.6 C29.2@11.55,92.825
  Top Layer w0.2: 9.35,86.8 U4.13@10.05,86.8 ; v1(11.7,88.55) 12,88.25 U4.9@12,87.45 ; v1(34.8,59.85) 34.85,59.85 v1(35.6,59.1) U1.R15@36,58.7 ; v1(34.8,64.7) U1.H14@35.2,64.3 v1(35.6,63.9) U1.J15@36,63.5 ; U1.M14@35.2,61.1 v1(35.6,60.7) U1.N15@36,60.3 ; U1.K14@35.2,62.7 v1(35.6,62.3) U1.L15@36,61.9 ; U1.F14@35.2,65.9 v1(35.6,65.5) U1.G15@36,65.1 ; v1(35.6,67.1) U1.E15@36,66.7 ; v1(52.25,57.87) U2.R9@52.25,59.2 ; U2.K8@56.25,60 56.65,59.6 v1(56.65,58.75)
  Top Layer w0.3: C42.2@7.7,88.45 v1(8.2,87.95) ; v1@8.125,88.025 9.35,86.8 ; C29.2@11.325,92.6 v1(11.325,93.425) ; C29.2@11.55,92.825 v1(11.95,92.825) ; v1(39.03,51.28) 39.03,50.68 C28.2@39.08,50.63 ; C26.2@41.52,77.55 42.06,77.55 v1(42.13,77.62) ; v1(51.75,66.12) U2.R1@52.25,65.62 ; C73.2@52.25,57.27 v1(52.25,57.87) ; C19.2@53.84,57.17 53.85,57.18 v1(53.85,57.87) 53.88,57.9 53.88,59.17 U2.N9@53.85,59.2 ; U2.N1@53.85,65.6 53.85,66.04 v1(53.93,66.12) ; C74.2@54.27,51.4 54.29,51.42 v1(54.29,52.02) ; U2.K2@56.25,64.79 U2.K2@56.25,64.8 ; v1(56.38,73) 56.38,73.63 C27.2@56.43,73.68 ; v1(57.85,58.7) U2.H9@57.85,59.2 ; v1(58.25,61.2) U2.G7@58.65,60.8 ; 59.055,65.205 U2.F1@59.45,65.6 v1(59.45,66.1) ; U2.E9@60.25,59.2 v1(60.65,58.8) U2.D9@61.05,59.2 ; C15.2@61.36,55.78 61.36,56.73 C17.2@61.8,57.17 61.86,57.23 v1(61.86,57.87) 61.85,57.88 U2.C9@61.85,59.2 ; U2.C1@61.85,65.6 v1(61.85,66.1) ; v1(62.25,64.4) U2.B2@62.65,64.8 ; v1(63.32,66.1) 63.45,65.97 U2.A1@63.45,65.6
  Top Layer w0.6: L2.2@10.7,91.45 11.2,91.45 11.3,91.55 C29.2@11.3,92.55
  Signal Layer 2 w0.175: v1@11.692,88.558 9.628,88.558 8.296,87.225 7.55,87.225 7.2,87.575 7.2,91.9 11.3,96 33.825,96 39.525,90.3 39.525,77.275 39.5,77.25
  Bottom Layer w0.2: C59.2@34.6,59.15 34.8,59.35 v1(34.8,59.85) ; C55.2@34.6,63.95 34.8,64.15 v1(34.8,64.7) v1@34.888,64.7 ; v1(35.6,59.1) 36.09,59.1 C60.2@36.22,58.97 ; v1(35.6,60.7) 35.64,60.66 C58.2@36.22,60.66 ; v1(35.6,62.3) C57.2@36.22,62.3 ; v1(35.6,63.9) 35.67,63.97 C56.2@36.22,63.97 ; v1(35.6,65.5) 36.16,65.5 C54.2@36.25,65.59 ; v1(35.6,67.1) 35.79,67.29 C53.2@36.22,67.29
  Bottom Layer w0.3: v1(51.75,66.12) 51.75,66.81 C64.2@51.85,66.91 ; C64.2@51.95,66.91 51.95,67.65 C16.2@52.39,68.09 ; C23.2@59.37,66.86 59.45,66.78 v1(59.45,66.1) ; v1(60.65,58.8) 61.24,58.8 C22.1@61.33,58.71 ; v1(61.85,66.1) 61.85,66.75 C21.2@61.96,66.86 ; v1@63.35,66.1 63.64,66.39 C20.2@63.64,66.86
VDD_USB: C52.2 C71.2 U1.W12 U1.W15 U4.39 | length 58.8
  Top Layer w0.2: U4.39@15.95,84.8 16.75,84.8 16.8,84.75 v1(17.3,84.75) ; v1(36,54.934) U1.W15@36,55.5
  Top Layer w0.24: U1.W12@33.6,55.5 34.2,54.9
  Top Layer w0.3: 34.2,54.9 C71.2@34.2,54.125 v1(34.95,54.125)
  Top Layer w0.45: v1(17.3,84.75) C52.2@17.85,84.75
  Signal Layer 2 w0.3: v1(17.3,84.75) 18.4,83.65 18.4,81.475 17.428,80.503 16.153,80.503 14.225,78.575 14.225,70.35 18,66.575 18,55.25 20.5,52.75 29.75,52.75 31.125,54.125 v1(34.95,54.125) 35.191,54.125 v1(36,54.934)
VDDA: C49.2 R42.1 U4.20 | length 6.5
  Top Layer w0.2: 9.15,84 U4.20@10.05,84
  Top Layer w0.3: v1(8.2,83.05) 9.15,84
  Top Layer w0.45: C49.2@7.65,83.05 v1(8.2,83.05)
  Bottom Layer w0.3: R42.1@5.675,80.875 5.675,81.35 7.375,83.05 v1(8.2,83.05)
VDDA_1V8: C66.2 C67.2 U1.B12 U1.V11 | length 20.1
  Top Layer w0.12: C67.2@32.45,54.14 32.44,54.15 32.44,55.94 U1.V11@32.8,56.3 ; C66.2@33.59,71.35 33.96,70.98 v1(33.96,69.46) U1.B12@33.6,69.1
  Top Layer w0.3: U1.V11@32.8,56.3 v1(33.2,56.7)
  Bottom Layer w0.2: v1(33.2,56.7) 33.9,57.4 34.925,57.4 35.2,57.675 35.2,68.22 v1(33.96,69.46)
VREF+: C50.2 R41.2 U1.N3 | length 2.6
  Top Layer w0.2: v1(26,59.9) U1.N3@26.4,60.3
  Bottom Layer w0.2: R41.2@24.275,60.575 24.6,60.25 25.025,60.25 25.375,59.9 v1(26,59.9)
VREF_DDR: C24.2 C25.2 C45.2 C72.2 U1.W16 U2.H1 U2.M8 U4.16 | length 153
  Top Layer w0.2: v1(5.425,86.375) 7.125,86.375 C45.2@7.65,85.85 7.75,85.75 9.3,85.75 9.45,85.6 U4.16@10.05,85.6 ; U2.M8@54.65,60 54.25,59.6 54.25,58.57 54.66,58.16 C25.2@54.66,57.17
  Top Layer w0.24: C72.2@36.8,54.16 U1.W16@36.8,55.5
  Top Layer w0.3: U2.H1@57.85,65.6 v1(57.85,66.1)
  Top Layer w0.4: v1(50.48,56.55) 54.45,56.55 54.66,56.76 C25.2@54.66,57.17
  Top Layer w0.5: C72.2@36.8,54.16 37.35,54.16 41.47,50.04 47.92,50.04 50.47,52.59 61.48,52.59 66.39,57.5 66.39,67.21 58.65,74.95 v2(56.35,74.95)
  Bottom Layer w0.4: v1(50.48,52.6) v1(50.48,56.55) ; v1(57.85,66.1) 57.671,66.279 C24.2@57.67,66.86 57.669,67.329 59.22,68.883 v1(64.7,68.89)
  Bottom Layer w0.5: v1(5.425,86.375) 5.45,86.4 5.875,86.4 7.375,87.9 7.375,89.55 6.675,90.25 6.675,92.225 11.625,97.175 33.2,97.175 55.425,74.95 v2(56.35,74.95)
VTT_DDR: C1.2 C2.2 C3.2 C4.2 C5.2 C6.2 C7.2 C8.2 C9.2 C10.2 C11.2 C12.2 C46.2 C62.2 C63.2 R1.2 R2.2 R3.2 R4.2 R5.2 R6.2 R7.2 R8.2 R9.2 R10.2 R11.2 R12.2 R13.2 R14.2 R15.2 R16.2 R17.2 R18.2 R19.2 R20.2 R21.2 R22.2 R23.2 R24.2 R25.2 U4.14 | length 78.4
  Top Layer w0.2: 9.4,86.4 U4.14@10.05,86.4
  Top Layer w0.3: C46.2@7.625,87.3 C46.2@7.625,87.15 7.625,86.825 8.05,86.4 9.4,86.4
  Top Layer w0.6: v1(6.525,88.4) C46.2@7.625,87.3
  Bottom Layer w0.8: v1(6.525,88.4) 5.7,89.225 5.7,92.925 11.35,98.575 34.325,98.575 60.5,72.4 60.5,71.5
pads on no net: U1.A2 U1.A3 U1.A4 U1.A10 U1.A11 U1.A13 U1.A14 U1.A15 U1.B1 U1.B3 U1.B4 U1.B5 U1.B10 U1.B11 U1.B13 U1.B14 U1.B15 U1.C1 U1.C2 U1.C4 U1.C5 U1.C6 U1.C7 U1.C8 U1.C10 U1.C11 U1.D2 U1.D3 U1.D6 U1.D7 U1.D10 U1.D11 U1.D12 U1.D13 U1.D14 U1.D15 U1.D16 U1.E1 U1.E3 U1.F1 U1.F2 U1.F3 U1.G1 U1.G3 U1.H1 U1.H2 U1.J2 U1.J19 U1.K1 U1.K3 U1.K4 U1.K18 U1.L2 U1.M1 U1.M2 U1.N1 U1.N2 U1.N19 U1.P1 U1.P2 U1.P3 U1.P4 U1.R1 U1.R4 U1.T1 U1.T2 U1.T3 U1.T5 U1.T6 U1.T7 U1.T8 U1.T9 U1.T10 U1.T11 U1.T12 U1.T13 U1.T14 U1.T16 U1.U1 U1.U2 U1.U4 U1.U5 U1.U7 U1.U9 U1.U10 U1.U15 U1.U16 U1.V1 U1.V2 U1.V3 U1.V4 U1.V5 U1.V6 U1.V7 U1.V8 U1.V9 U1.V10 U1.V13 U1.V14 U1.V16 U1.V17 U1.W2 U1.W3 U1.W4 U1.W5 U1.W6 U1.W7 U1.W8 U1.W9 U1.W10 U1.W13 U1.W14 U2.J1 U2.J9 U2.L1 U2.L9 U4.2 U4.18 U4.21 U4.23 U4.34 U4.35 U4.38 U5.A1 U5.A2 U5.A7 U5.A8 U5.A9 U5.A10 U5.A11 U5.A12 U5.A13 U5.A14 U5.B1 U5.B7 U5.B8 U5.B9 U5.B10 U5.B11 U5.B12 U5.B13 U5.B14 U5.C1 U5.C3 U5.C5 U5.C7 U5.C8 U5.C9 U5.C10 U5.C11 U5.C12 U5.C13 U5.C14 U5.D1 U5.D2 U5.D3 U5.D4 U5.D12 U5.D13 U5.D14 U5.E1 U5.E2 U5.E3 U5.E5 U5.E8 U5.E9 U5.E10 U5.E12 U5.E13 U5.E14 U5.F1 U5.F2 U5.F3 U5.F10 U5.F12 U5.F13 U5.F14 U5.G1 U5.G2 U5.G3 U5.G10 U5.G12 U5.G13 U5.G14 U5.H1 U5.H2 U5.H3 U5.H5 U5.H12 U5.H13 U5.H14 U5.J1 U5.J2 U5.J3 U5.J12 U5.J13 U5.J14 U5.K1 U5.K2 U5.K3 U5.K6 U5.K7 U5.K10 U5.K12 U5.K13 U5.K14 U5.L1 U5.L2 U5.L3 U5.L12 U5.L13 U5.L14 U5.M1 U5.M2 U5.M3 U5.M7 U5.M8 U5.M9 U5.M10 U5.M11 U5.M12 U5.M13 U5.M14 U5.N1 U5.N3 U5.N6 U5.N7 U5.N8 U5.N9 U5.N10 U5.N11 U5.N12 U5.N13 U5.N14 U5.P1 U5.P2 U5.P7 U5.P8 U5.P9 U5.P10 U5.P11 U5.P12 U5.P13 U5.P14

## Polygon pours and split planes (outlines as drawn)
GND on Signal Layer 1 "GND" (solid, remove dead copper, pour order 96): 0.408,119.592 85.592,119.592 85.592,0.408 0.408,0.408
GND on Bottom Layer "L11-D_GND" (solid, remove dead copper, pour order 140): 0,-0.25 88.5,-0.25 88.5,120 0,120
VTT_DDR on Bottom Layer "VTT_DDR" (solid, pour order 98): 66.174,71.97 68.31,69.936 68.31,55.97 66.48,54.14 50.87,54.14 50.87,54.97 50.87,56.2 61.69,56.2 65.475,56.2 66.27,56.995 66.27,61.95 66.275,68.325 64.745,69.845 63.26,69.845 62.62,69.845 61.15,69.845 59.66,69.845 58.05,69.845 56.455,69.845 55.24,69.845 52.34,69.845 52.34,71.97 54.3,71.97 55.89,71.97 59.41,71.97 61.135,71.97 62.95,71.97
GND on Top Layer "GND_L01_P148" (solid, remove dead copper, pour order 148): 0.475,119.599 0.475,0.625 85.55,0.625 85.55,119.6
5V_VIN on Top Layer "5V_VIN" (solid, remove dead copper, pour order 134): 9.5,89.15 9.4,89.25 8.6,89.25 8.5,89.15 8.5,88.375 9.825,87.05 10.8,87.05 10.9,87.15 10.9,87.95 10.6,88.25 10,88.25 9.5,88.75
5V_VIN on Top Layer "5V_VIN" (solid, remove dead copper, pour order 132): 9.5,79.85 8.6,79.85 8.5,79.95 8.5,80.75 9.8,82.05 11,82.05 11.1,82.15 11.1,82.95 11.3,82.95 11.3,81.65 11.2,81.55 10.8,81.15 10,81.15 9.65,80.8 9.65,80.05
NetL4_1 on Top Layer "NetL4_1" (solid, remove dead copper, pour order 124): 11.5,81.65 11.5,82.95 11.7,82.95 11.7,80.05 11.4,79.75 9.9,79.75 9.8,79.85 9.8,80.75 10.1,81.05 10.9,81.05
NetL3_1 on Top Layer "NetL3_1" (solid, remove dead copper, pour order 122): 13.1,82.95 13.3,82.95 13.3,81.75 13.4,81.65 13.6,81.65 14.2,81.05 14.7,81.05 15.075,80.675 15.075,80.025 14.8,79.75 13.1,79.75 13.1,80.85
5V_VIN on Top Layer "NetC47_2" (solid, remove dead copper, pour order 114): 12.7,82.95 12.7,82.05 12.4,81.75 12.4,81.15 12.1,80.85 11.9,80.85 11.8,80.75 11.8,80.25 11.9,80.15 12.8,80.15 12.9,80.25 12.9,80.85 13,80.95 13,82.85 12.9,82.95
NetL2_1 on Top Layer "NetL2_1" (solid, remove dead copper, pour order 130): 11.3,88.95 11.3,88.25 11.275,88.225 11.1,88.225 10.775,88.55 10.1,88.55 9.7,88.95 9.7,90.35 9.9,90.55 11.5,90.55 11.7,90.35 11.7,89.35
5V_VIN on Top Layer "5V_VIN" (solid, remove dead copper, pour order 128): 11.9,90.05 11.8,89.95 11.8,89.05 12.1,88.75 12.4,88.75 12.9,89.25 12.9,90.05
NetL1_1 on Top Layer "NetL1_1" (solid, remove dead copper, pour order 126): 15.05,90.35 13.1,90.35 13.1,89.25 12.7,88.85 12.7,88.55 12.8,88.45 13.2,88.45 14,89.25 14.9,89.25 15.05,89.4
GND on Signal Layer 2 "L11-D_GND" (solid, remove dead copper, pour order 142): 0,120 86,120 86,-4.5 0,-4.5
VDD on Signal Layer 2 "VDD" (solid, remove dead copper, pour order 86): 14.237,78.125 20,64.367 20,55.75 32.5,55.75 32.5,59.75 31.75,59.75 31.75,60.986 30,60.986 30,63.25 23.75,63.25 23.75,68.75 17.196,78.125
5V_VIN on Signal Layer 2 "5V_VIN" (solid, pour order 136): 8.011,80.816 8,80.828 8,88.55 11.35,88.55 11.359,88.559 11.359,89.316 15.916,89.316 15.925,89.325 15.934,89.316 15.934,83.691 17.998,83.691 18.004,83.686 18,83.682 18,81.575 17.241,80.816
VDD_DDR on Signal Layer 2 "VDD_DDR" (solid, remove dead copper, pour order 81): 8.2,87.675 7.45,87.967 7.45,91.6 11.625,95.775 33.55,95.775 39,90.325 39,78.75 67.175,78.75 67.175,49.175 34.45,49.175 34.45,89.525 30.6,93.375 13.075,93.375 10.3,90.6 10.3,89.417
VDD_CORE on Signal Layer 2 "VDD_CORE" (solid, remove dead copper, pour order 88): 26.225,84.05 20.775,89.5 14.875,89.5 14.875,93 25.775,93 29.375,89.4 31.75,87.024 31.75,70.25 34.25,70.25 34.25,58.75 32.75,58.75 32.75,60 32,60 32,61.25 30.25,61.25 30.25,63.5 24.25,63.5 24.25,68.209 26.225,68.209

## Other copper
Top Layer:
  pour cut-out: 10.5,87.05 15.5,87.05 15.5,82.95 10.5,82.95
  pour cut-out: 36.55,70.225 24.425,70.225 24.425,55.225 36.55,55.225 36.55,49.325 68.525,49.325 68.525,72.747 68.497,72.775 36.55,72.775
Bottom Layer:
  pour cut-out: 36.5,55.362 41,49 52.65,49 52.65,51.875 51.625,52.9 50.45,52.9 50.48,56.625 65.475,56.625 65.675,56.625 66.275,57.116 66.275,67.068 64.825,68.375 63.854,69.25 52.3,69.25 52.3,78.15 52.3,78.9 43.074,78.9 36.5,72.326

## Silkscreen, mask and mechanical layers (free items; w line width, h text height)
Bottom Overlay:
  lines w0.2: 31.5,52.25 31.5,56.5 ; 32,56 31.5,56.5 ; 57.75,50.5 57.75,52.5 ; 58.25,52 57.75,52.5 ; 59,71.75 58.5,72.25 ; 59,72.75 58.5,72.25 ; 60.5,74 60.5,73.25 59.5,72.25 58.5,72.25 ; 70.25,61.75 69.75,62.25 ; 70.25,62.75 69.75,62.25 ; 71.25,62.25 69.75,62.25 ; 31,56 31,56 ; 31,56 31.5,56.5 ; 57.75,52.5 57.75,52.5 ; 57.75,52.5 57.25,52 57.75,52.5 ; 58.5,72.25 58.5,72.25 ; 26.25,31.75 37.75,31.75 37.75,51.25 26.25,51.25 26.25,31.75 ; 52.5,43.5 52.5,50.25 69.5,50.25 69.5,44 69.5,43.5 52.5,43.5 ; 53.75,74.25 53.75,80 63,80 63,74.25 53.75,74.25 ; 71.5,56.75 77.75,56.75 77.75,69.25 71.5,69.25 71.5,56.75

## Text inside footprints (layer, text, board x,y; h text height)
B1: Top Overlay "1" at 0.75,95.5 h1.5; Top Overlay "2" at 5.025,95.6 h1.3; Top Overlay "3" at 2.1,94.1 h1.3; Top Overlay "4" at 4.975,94.1 h1.3; Top Overlay "1" at 2.125,95.6 h1.3; M14-Top Assembly "4" at 4.975,94.1 h1.3; M14-Top Assembly "3" at 2.1,94.1 h1.3; M14-Top Assembly "2" at 5.025,95.6 h1.3; M14-Top Assembly "1" at 2.125,95.6 h1.3
U1: M14-Top Assembly "A1" at 24.55,69.7 h0.4
U2: M14-Top Assembly "A1" at 63.25,65.95 h0.75 r270
U4: Top Overlay "1" at 15.425,87.95 h1.5 r270; M14-Top Assembly "1" at 15.05,87.675 h0.5 r270; M14-Top Assembly "12" at 10.625,87.95 h0.5 r270; M14-Top Assembly "13" at 9.64,87.02 h0.5 r270; M14-Top Assembly "22" at 9.64,83.44 h0.5 r270; M14-Top Assembly "23" at 10.65,82.475 h0.5 r270; M14-Top Assembly "34" at 15.05,82.475 h0.5 r270; M14-Top Assembly "35" at 16.06,83.42 h0.5 r270; M14-Top Assembly "44" at 16.05,87.04 h0.5 r270; M14-Top Assembly "ep" at 12.8,85.7 h1.5 r270
U5: Top Overlay "A1" at 35.65,80.575 h1.5 r90; M14-Top Assembly "A1" at 31.8,84.225 h0.5 r90